# Altium PCB PCB1.PcbDoc (part 2 of 2)
Units mm, origin at the board's own origin, x right, y up, seen from the top; angles counter-clockwise.
Board outline 42.2 x 61.7 mm, 4 copper layers (Top Layer, Mid Layer 1, Mid Layer 2, Bottom Layer), stack 1.586 mm thick; 117 components, 70 nets, 392 pads, 1231 vias.
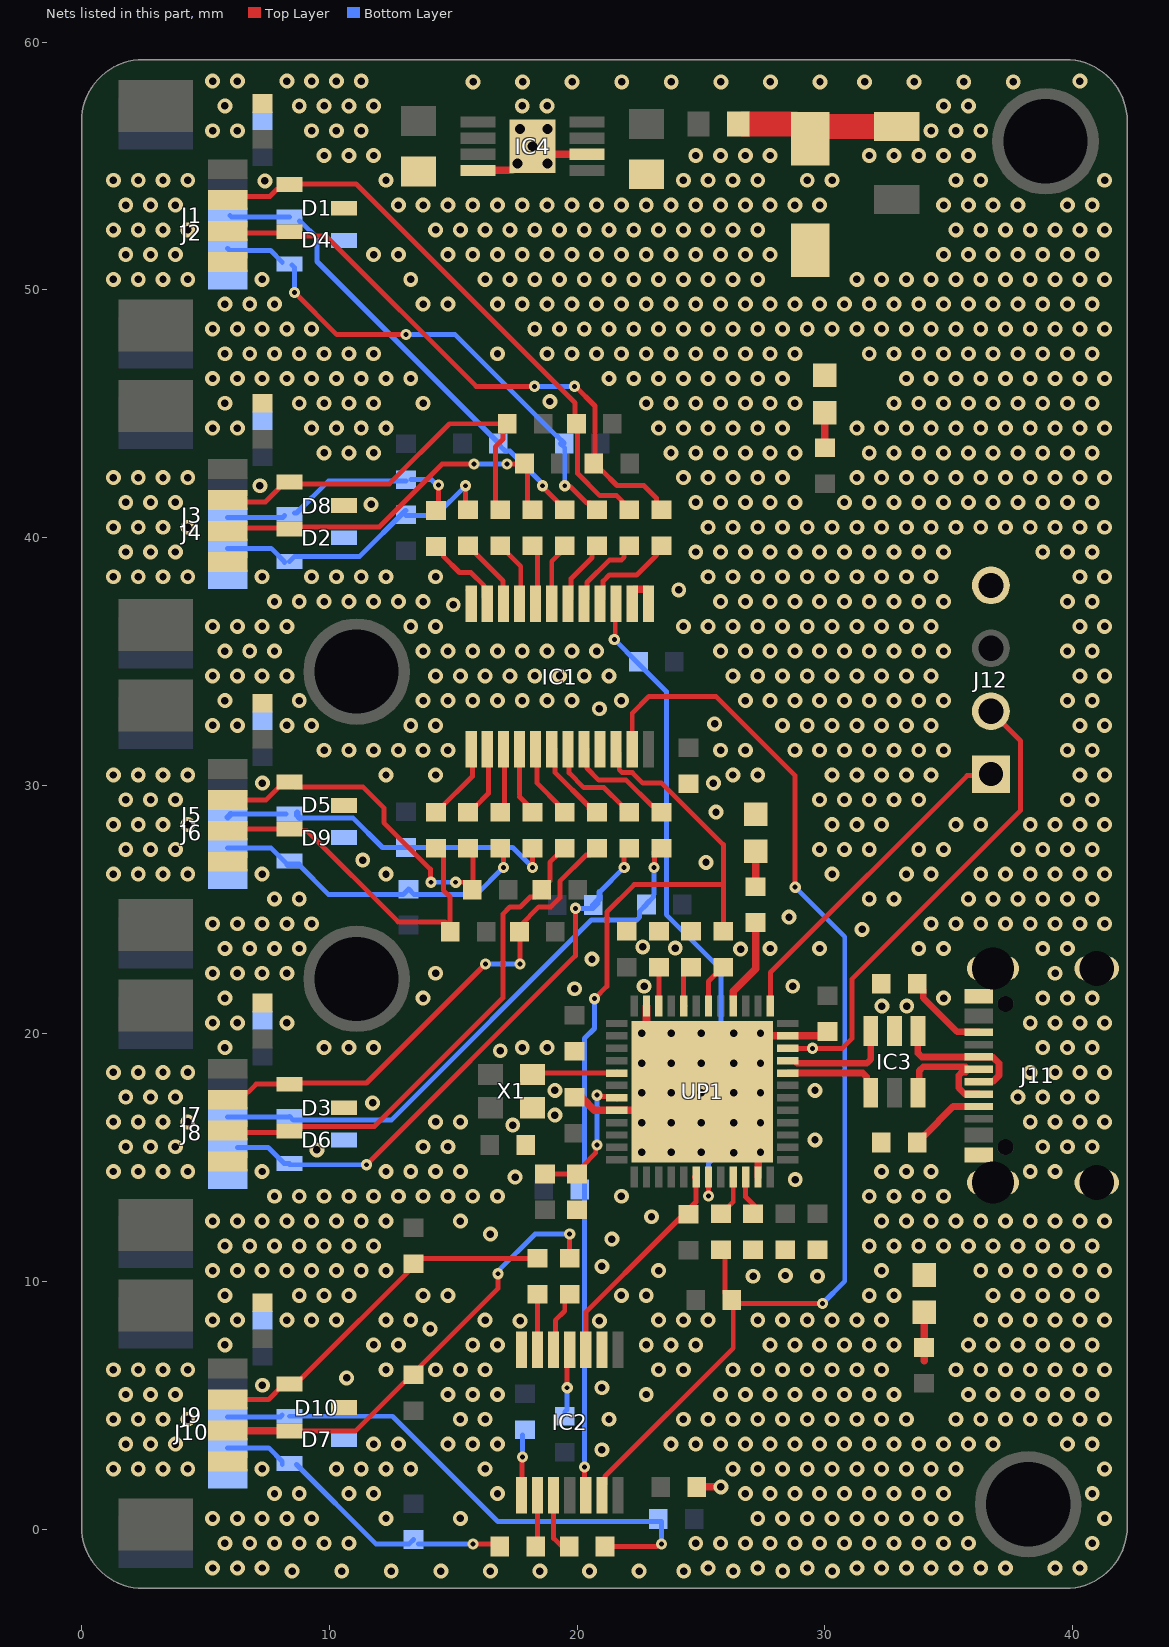
[diagram p4: the nets of this part, all layers, seen from the top]

## Via types
v1: diameter 0.6, hole 0.3, Top Layer to Bottom Layer, tented both sides, 1189 vias
v2: diameter 0.45, hole 0.2, Top Layer to Bottom Layer, tented both sides, 35 vias
v3: diameter 0.6, hole 0.4, Top Layer to Bottom Layer, tented both sides, 7 vias

## Nets (pads, with @x,y where several pads share a name; then routed paths per layer and width w, separated by ;. In a path a pad name is that pad's centre, name@x,y a point inside that pad or via, vN(x,y) a via of type N, cw(c..) or ccw(c..) an arc to the next point about the centre after c; other vN are vias at no path point) (continued)
GND: C1.2 C2.2 C3.2 C4.2 C5.2 C6.2 C7.2 C8.2 C9.2 C10.2 C11.2 C12.2 C13.2 C14.2 C15.2 C16.2 C17.2 C18.2 C19.2 C20.2 C21.2 C22.2 C23.2 C24.2 D1.3 D2.3 D3.3 D4.3 D5.3 D6.3 D7.3 D8.3 D9.3 D10.3 D11.2 IC1.1 IC1.2 IC1.12 IC1.21 IC2.2 IC2.7 IC3.2 IC4.4 IC4.6 IC4.9 J1.4 J2.1 J3.4 J4.1 J5.4 J6.1 J7.4 J8.1 J9.4 J10.1 J11.1 J11.2 J11.3 J11.4 J11.A1-B12 J11.B1-A12 J12.4 OL1.1 OL2.1 OL3.1 R5.1 R54.2 R55.2 UP1.8 UP1.23 UP1.35 UP1.47 UP1.49 X1.2 | length 15.4
  Top Layer w0.2: D8.3@10.65,41.225 D8.3@10.875,41.225
  Top Layer w0.305: J3.4@5.253,38.777 5.5,39.025 J3.4@5.9,39.025 ; IC1.12@15.653,37.9 15.725,37.828 IC1.12@15.725,37.338 ; IC4.4@16,54.825 17.377,54.825 17.7,55.148 IC4.9@17.7,55.4 ; IC2.7@17.678,7.8 17.75,7.728 IC2.7@17.75,7.238 ; X1.2@17.925,16.9 X1.2@18.05,17.025 ; IC4.9@18.9,55.5 18.925,55.475 IC4.6@20.4,55.475 ; C6.2@20.2,17.4 20.7,16.9 UP1.8@21.6,16.9 UP1.49@22.4,16.9 ; IC1.21@20.913,31.474 IC1.21@20.925,31.462 ; IC1.2@22.225,37.338 22.225,37.851 22.297,37.923 22.875,37.923 IC1.1@22.898,37.9 ; UP1.49@22.8,20.1 UP1.47@22.8,21.1 ; C11.2@24.522,30.083 C11.2@24.526,30.088 ; C12.2@24.825,1.7 v1(25.8,1.7) ; v1@25.488,30.088 v1(25.5,30.1) ; UP1.23@27.3,14.2 27.3,15.1 v1(27.4,15.2) ; UP1.49@27.5,19.9 UP1.35@28.5,19.9 28.503,19.903 30.003,19.903 C2.2@30.2,20.1
  other v1: 8.5,-1.7 10.5,-1.7 12.5,-1.7 14.5,-1.7 16.5,-1.7 18.5,-1.7 20.5,-1.7 22.5,-1.7 24.3,-1.7 26.3,-1.7 28.3,-1.7 30.3,-1.7 5.287,-1.573 6.287,-1.573 7.287,-1.573 25.287,-1.573 27.287,-1.573 29.287,-1.573 31.287,-1.573 32.287,-1.573 33.287,-1.573 34.287,-1.573 35.287,-1.573 36.287,-1.573 37.287,-1.573 39.287,-1.573 40.287,-1.573 5.787,-0.573 6.787,-0.573 7.787,-0.573 8.787,-0.573 9.787,-0.573 10.787,-0.573 24.787,-0.573 25.787,-0.573 26.787,-0.573 27.787,-0.573 28.787,-0.573 29.787,-0.573 30.787,-0.573 31.787,-0.573 32.787,-0.573 33.787,-0.573 34.787,-0.573 35.787,-0.573 40.787,-0.573 5.287,0.427 6.287,0.427 7.287,0.427 8.287,0.427 9.287,0.427 12.287,0.427 15.287,0.427 27.287,0.427 28.287,0.427 29.287,0.427 30.287,0.427 31.287,0.427 32.287,0.427 33.287,0.427 34.287,0.427 35.287,0.427 41.287,0.427 7.787,1.427 8.787,1.427 10.787,1.427 11.787,1.427 16.787,1.427 26.787,1.427 27.787,1.427 28.787,1.427 29.787,1.427 30.787,1.427 31.787,1.427 32.787,1.427 33.787,1.427 34.787,1.427 40.787,1.427 1.287,2.427 2.287,2.427 3.287,2.427 4.287,2.427 7.287,2.427 10.287,2.427 11.287,2.427 12.287,2.427 13.287,2.427 16.287,2.427 26.287,2.427 27.287,2.427 28.287,2.427 29.287,2.427 30.287,2.427 31.287,2.427 32.287,2.427 33.287,2.427 34.287,2.427 35.287,2.427 41.287,2.427 21,3.2 1.787,3.427 2.787,3.427 3.787,3.427 11.787,3.427 12.787,3.427 14.787,3.427 15.787,3.427 16.787,3.427 23.787,3.427 24.787,3.427 25.787,3.427 26.787,3.427 27.787,3.427 28.787,3.427 29.787,3.427 30.787,3.427 31.787,3.427 32.787,3.427 33.787,3.427 34.787,3.427 35.787,3.427 36.787,3.427 39.787,3.427 40.787,3.427 1.287,4.427 2.287,4.427 3.287,4.427 4.287,4.427 15.287,4.427 16.287,4.427 21.287,4.427 24.287,4.427 25.287,4.427 26.287,4.427 27.287,4.427 28.287,4.427 29.287,4.427 30.287,4.427 31.287,4.427 32.287,4.427 33.287,4.427 35.287,4.427 36.287,4.427 37.287,4.427 38.287,4.427 39.287,4.427 40.287,4.427 41.287,4.427 1.787,5.427 2.787,5.427 3.787,5.427 14.787,5.427 15.787,5.427 16.787,5.427 22.787,5.427 25.787,5.427 26.787,5.427 27.787,5.427 28.787,5.427 29.787,5.427 30.787,5.427 31.787,5.427 32.787,5.427 35.787,5.427 36.787,5.427 37.787,5.427 38.787,5.427 39.787,5.427 40.787,5.427 21,5.7 7.3,5.8 10.7,6.1 1.287,6.427 2.287,6.427 3.287,6.427 4.287,6.427 12.287,6.427 14.287,6.427 15.287,6.427 16.287,6.427 23.287,6.427 24.287,6.427 26.287,6.427 27.287,6.427 28.287,6.427 29.287,6.427 30.287,6.427 31.287,6.427 32.287,6.427 35.287,6.427 36.287,6.427 37.287,6.427 38.287,6.427 39.287,6.427 40.287,6.427 41.287,6.427 5.787,7.427 11.787,7.427 12.787,7.427 15.787,7.427 16.787,7.427 22.787,7.427 23.787,7.427 24.787,7.427 27.787,7.427 28.787,7.427 29.787,7.427 30.787,7.427 31.787,7.427 32.787,7.427 35.787,7.427 36.787,7.427 37.787,7.427 38.787,7.427 39.787,7.427 40.787,7.427 14.066,8.075 17.7,8.4 20.9,8.4 5.287,8.427 6.287,8.427 8.287,8.427 9.287,8.427 10.287,8.427 12.287,8.427 13.287,8.427 16.287,8.427 23.287,8.427 24.287,8.427 25.287,8.427 27.287,8.427 28.287,8.427 29.287,8.427 30.287,8.427 31.287,8.427 32.287,8.427 36.287,8.427 37.287,8.427 38.287,8.427 39.287,8.427 40.287,8.427 41.287,8.427 5.787,9.427 8.787,9.427 9.787,9.427 10.787,9.427 13.787,9.427 14.787,9.427 21.787,9.427 22.787,9.427 31.787,9.427 32.787,9.427 36.787,9.427 37.787,9.427 38.787,9.427 39.787,9.427 40.787,9.427 27.1,10.2 29.7,10.2 28.403,10.231 5.287,10.427 6.287,10.427 7.287,10.427 8.287,10.427 9.287,10.427 10.287,10.427 11.287,10.427 12.287,10.427 23.287,10.427 32.287,10.427 36.287,10.427 37.287,10.427 38.287,10.427 39.287,10.427 40.287,10.427 41.287,10.427 21,10.6 5.787,11.427 6.787,11.427 7.787,11.427 8.787,11.427 9.787,11.427 10.787,11.427 11.787,11.427 31.787,11.427 32.787,11.427 33.787,11.427 34.787,11.427 35.787,11.427 36.787,11.427 37.787,11.427 38.787,11.427 39.787,11.427 40.787,11.427 21.4,11.7 16.5,11.9 5.287,12.427 6.287,12.427 7.287,12.427 8.287,12.427 9.287,12.427 10.287,12.427 11.287,12.427 12.287,12.427 15.287,12.427 32.287,12.427 33.287,12.427 34.287,12.427 35.287,12.427 36.287,12.427 37.287,12.427 38.287,12.427 39.287,12.427 40.287,12.427 41.287,12.427 23,12.6 7.787,13.427 8.787,13.427 9.787,13.427 10.787,13.427 11.787,13.427 12.787,13.427 13.787,13.427 14.787,13.427 15.787,13.427 16.787,13.427 21.787,13.427 31.787,13.427 32.787,13.427 33.787,13.427 34.787,13.427 28.8,14.1 17.5,14.2 1.287,14.427 2.287,14.427 3.287,14.427 4.287,14.427 7.287,14.427 12.287,14.427 13.287,14.427 14.287,14.427 15.287,14.427 32.287,14.427 33.287,14.427 34.287,14.427 38.287,14.427 39.287,14.427 26.322,15.183 22.6,15.2 23.8,15.2 25,15.2 9.5,15.3 1.787,15.427 2.787,15.427 3.787,15.427 13.787,15.427 14.787,15.427 38.787,15.427 39.787,15.427 40.787,15.427 29.6,15.7 17.4,16.3 22.6,16.4 23.8,16.4 25,16.4 26.327,16.4 27.4,16.4 1.287,16.427 2.287,16.427 3.287,16.427 4.287,16.427 14.287,16.427 15.287,16.427 38.287,16.427 39.287,16.427 40.287,16.427 41.287,16.427 19.1,16.7 11.749,17.193 1.787,17.427 2.787,17.427 3.787,17.427 37.787,17.427 38.787,17.427 39.787,17.427 40.787,17.427 22.6,17.6 23.8,17.6 25,17.6 26.327,17.6 27.4,17.6 19.1,17.7 29.6,17.7 1.287,18.427 2.287,18.427 3.287,18.427 4.287,18.427 38.287,18.427 39.287,18.427 40.287,18.427 41.287,18.427 22.6,18.8 23.8,18.8 25,18.8 26.327,18.8 27.4,18.8 16.9,19.3 5.787,19.427 9.787,19.427 10.787,19.427 11.787,19.427 17.787,19.427 18.787,19.427 38.787,19.427 39.787,19.427 40.787,19.427 22.6,20 23.8,20 25,20 26.327,20 27.4,20 5.287,20.427 6.287,20.427 8.287,20.427 38.287,20.427 39.287,20.427 40.287,20.427 41.287,20.427 32.3,21.1 33.3,21.1 5.787,21.427 13.787,21.427 34.787,21.427 38.787,21.427 39.787,21.427 40.787,21.427 19.9,21.8 22.7,21.9 28.7,21.9 5.287,22.427 6.287,22.427 7.287,22.427 8.287,22.427 14.287,22.427 39.287,22.427 20.6,23 26.6,23.4 5.787,23.427 6.787,23.427 7.787,23.427 8.787,23.427 23.959,23.441 27.787,23.427 29.787,23.427 33.787,23.427 34.787,23.427 38.787,23.427 39.787,23.427 22.649,23.493 31.5,24.2 5.287,24.427 6.287,24.427 7.287,24.427 8.287,24.427 9.287,24.427 34.287,24.427 35.287,24.427 36.287,24.427 37.287,24.427 38.287,24.427 39.287,24.427 40.287,24.427 41.287,24.427 28.549,24.693 7.787,25.427 8.787,25.427 31.787,25.427 32.787,25.427 35.787,25.427 36.787,25.427 37.787,25.427 38.787,25.427 39.787,25.427 40.787,25.427 1.287,26.427 2.287,26.427 3.287,26.427 4.287,26.427 7.287,26.427 12.287,26.427 30.287,26.427 33.287,26.427 34.287,26.427 36.287,26.427 37.287,26.427 38.287,26.427 39.287,26.427 40.287,26.427 41.287,26.427 25.2,26.9 11.349,26.993 1.787,27.427 2.787,27.427 3.787,27.427 29.787,27.427 30.787,27.427 31.787,27.427 33.787,27.427 34.787,27.427 37.787,27.427 38.787,27.427 39.787,27.427 40.787,27.427 1.287,28.427 2.287,28.427 3.287,28.427 4.287,28.427 30.287,28.427 31.287,28.427 32.287,28.427 35.287,28.427 36.287,28.427 38.287,28.427 39.287,28.427 40.287,28.427 41.287,28.427 25.603,28.931 1.787,29.427 2.787,29.427 3.787,29.427 29.787,29.427 30.787,29.427 31.787,29.427 32.787,29.427 33.787,29.427 39.787,29.427 40.787,29.427 7.3,30.1 1.287,30.427 2.287,30.427 3.287,30.427 4.287,30.427 12.287,30.427 14.287,30.427 26.287,30.427 27.287,30.427 30.287,30.427 31.287,30.427 32.287,30.427 33.287,30.427 34.287,30.427 40.287,30.427 41.287,30.427 9.787,31.427 10.787,31.427 11.787,31.427 12.787,31.427 13.787,31.427 14.787,31.427 25.787,31.427 26.787,31.427 28.787,31.427 29.787,31.427 30.787,31.427 31.787,31.427 32.787,31.427 33.787,31.427 34.787,31.427 39.787,31.427 40.787,31.427 5.287,32.427 6.287,32.427 8.287,32.427 9.287,32.427 13.287,32.427 14.287,32.427 28.287,32.427 29.287,32.427 30.287,32.427 31.287,32.427 32.287,32.427 33.287,32.427 34.287,32.427 40.287,32.427 41.287,32.427 25.549,32.493 20.9,33.1 5.787,33.427 8.787,33.427 13.787,33.427 14.787,33.427 15.787,33.427 16.787,33.427 17.787,33.427 18.787,33.427 19.787,33.427 21.787,33.427 26.787,33.427 27.787,33.427 28.787,33.427 29.787,33.427 30.787,33.427 31.787,33.427 32.787,33.427 33.787,33.427 34.787,33.427 39.787,33.427 40.787,33.427 5.287,34.427 6.287,34.427 7.287,34.427 8.287,34.427 14.287,34.427 15.287,34.427 16.287,34.427 17.287,34.427 18.287,34.427 19.287,34.427 20.287,34.427 21.287,34.427 26.287,34.427 27.287,34.427 28.287,34.427 29.287,34.427 30.287,34.427 31.287,34.427 32.287,34.427 33.287,34.427 34.287,34.427 40.287,34.427 41.287,34.427 5.787,35.427 6.787,35.427 7.787,35.427 13.787,35.427 14.787,35.427 15.787,35.427 16.787,35.427 17.787,35.427 18.787,35.427 19.787,35.427 20.787,35.427 25.787,35.427 26.787,35.427 27.787,35.427 28.787,35.427 29.787,35.427 30.787,35.427 31.787,35.427 32.787,35.427 33.787,35.427 34.787,35.427 39.787,35.427 40.787,35.427 5.287,36.427 6.287,36.427 7.287,36.427 8.287,36.427 13.287,36.427 14.287,36.427 24.287,36.427 25.287,36.427 26.287,36.427 27.287,36.427 28.287,36.427 29.287,36.427 30.287,36.427 31.287,36.427 32.287,36.427 33.287,36.427 34.287,36.427 40.287,36.427 41.287,36.427 15,37.3 7.787,37.427 8.787,37.427 9.787,37.427 10.787,37.427 11.787,37.427 12.787,37.427 13.787,37.427 25.787,37.427 26.787,37.427 27.787,37.427 28.787,37.427 29.787,37.427 30.787,37.427 31.787,37.427 32.787,37.427 33.787,37.427 34.787,37.427 39.787,37.427 40.787,37.427 24.1,37.9 1.287,38.427 2.287,38.427 3.287,38.427 4.287,38.427 7.287,38.427 9.287,38.427 10.287,38.427 11.287,38.427 12.287,38.427 14.287,38.427 25.287,38.427 26.287,38.427 27.287,38.427 28.287,38.427 29.287,38.427 30.287,38.427 31.287,38.427 32.287,38.427 33.287,38.427 34.287,38.427 40.287,38.427 41.287,38.427 1.787,39.427 2.787,39.427 3.787,39.427 24.787,39.427 25.787,39.427 26.787,39.427 27.787,39.427 28.787,39.427 29.787,39.427 30.787,39.427 31.787,39.427 32.787,39.427 33.787,39.427 34.787,39.427 38.787,39.427 39.787,39.427 40.787,39.427 1.287,40.427 2.287,40.427 3.287,40.427 4.287,40.427 25.287,40.427 26.287,40.427 27.287,40.427 28.287,40.427 29.287,40.427 30.287,40.427 31.287,40.427 32.287,40.427 33.287,40.427 34.287,40.427 35.287,40.427 36.287,40.427 37.287,40.427 38.287,40.427 39.287,40.427 40.287,40.427 41.287,40.427 11.685,41.347 1.787,41.427 2.787,41.427 3.787,41.427 24.787,41.427 25.787,41.427 26.787,41.427 27.787,41.427 28.787,41.427 30.787,41.427 31.787,41.427 32.787,41.427 33.787,41.427 34.787,41.427 35.787,41.427 36.787,41.427 37.787,41.427 38.787,41.427 39.787,41.427 40.787,41.427 7.2,42.1 1.287,42.427 2.287,42.427 3.287,42.427 4.287,42.427 24.287,42.427 25.287,42.427 26.287,42.427 27.287,42.427 28.287,42.427 31.287,42.427 32.287,42.427 33.287,42.427 34.287,42.427 35.287,42.427 36.287,42.427 37.287,42.427 38.287,42.427 39.287,42.427 40.287,42.427 41.287,42.427 9.787,43.427 10.787,43.427 11.787,43.427 23.787,43.427 24.787,43.427 25.787,43.427 26.787,43.427 27.787,43.427 28.787,43.427 31.787,43.427 32.787,43.427 33.787,43.427 34.787,43.427 35.787,43.427 36.787,43.427 37.787,43.427 38.787,43.427 39.787,43.427 40.787,43.427 5.287,44.427 6.287,44.427 9.287,44.427 10.287,44.427 11.287,44.427 12.287,44.427 23.287,44.427 24.287,44.427 25.287,44.427 26.287,44.427 27.287,44.427 28.287,44.427 31.287,44.427 32.287,44.427 33.287,44.427 34.287,44.427 35.287,44.427 36.287,44.427 37.287,44.427 38.287,44.427 39.287,44.427 40.287,44.427 41.287,44.427 5.787,45.427 8.787,45.427 9.787,45.427 10.787,45.427 11.787,45.427 13.787,45.427 22.787,45.427 23.787,45.427 24.787,45.427 25.787,45.427 26.787,45.427 27.787,45.427 28.787,45.427 32.787,45.427 33.787,45.427 34.787,45.427 35.787,45.427 36.787,45.427 37.787,45.427 38.787,45.427 39.787,45.427 40.787,45.427 18.9,45.5 5.287,46.427 6.287,46.427 7.287,46.427 8.287,46.427 9.287,46.427 10.287,46.427 11.287,46.427 12.287,46.427 13.287,46.427 21.287,46.427 22.287,46.427 23.287,46.427 24.287,46.427 25.287,46.427 26.287,46.427 27.287,46.427 28.287,46.427 33.287,46.427 34.287,46.427 35.287,46.427 36.287,46.427 37.287,46.427 38.287,46.427 39.287,46.427 40.287,46.427 41.287,46.427 5.787,47.427 6.787,47.427 7.787,47.427 8.787,47.427 9.787,47.427 10.787,47.427 11.787,47.427 16.787,47.427 18.787,47.427 19.787,47.427 20.787,47.427 21.787,47.427 22.787,47.427 23.787,47.427 24.787,47.427 25.787,47.427 26.787,47.427 27.787,47.427 28.787,47.427 31.787,47.427 32.787,47.427 33.787,47.427 34.787,47.427 35.787,47.427 36.787,47.427 37.787,47.427 38.787,47.427 39.787,47.427 40.787,47.427 5.287,48.427 6.287,48.427 7.287,48.427 8.287,48.427 9.287,48.427 18.287,48.427 19.287,48.427 20.287,48.427 21.287,48.427 22.287,48.427 23.287,48.427 24.287,48.427 25.287,48.427 26.287,48.427 27.287,48.427 28.287,48.427 29.287,48.427 30.287,48.427 31.287,48.427 32.287,48.427 33.287,48.427 34.287,48.427 35.287,48.427 36.287,48.427 37.287,48.427 38.287,48.427 39.287,48.427 40.287,48.427 41.287,48.427 5.787,49.427 6.787,49.427 7.787,49.427 13.787,49.427 14.787,49.427 16.787,49.427 17.787,49.427 18.787,49.427 19.787,49.427 20.787,49.427 21.787,49.427 22.787,49.427 23.787,49.427 24.787,49.427 25.787,49.427 26.787,49.427 27.787,49.427 28.787,49.427 29.787,49.427 30.787,49.427 31.787,49.427 32.787,49.427 33.787,49.427 34.787,49.427 35.787,49.427 36.787,49.427 37.787,49.427 38.787,49.427 39.787,49.427 40.787,49.427 1.287,50.427 2.287,50.427 3.287,50.427 4.287,50.427 7.287,50.427 13.287,50.427 16.287,50.427 17.287,50.427 18.287,50.427 19.287,50.427 20.287,50.427 21.287,50.427 22.287,50.427 23.287,50.427 24.287,50.427 25.287,50.427 26.287,50.427 27.287,50.427 31.287,50.427 32.287,50.427 33.287,50.427 34.287,50.427 35.287,50.427 36.287,50.427 37.287,50.427 38.287,50.427 39.287,50.427 40.287,50.427 41.287,50.427 1.787,51.427 2.787,51.427 3.787,51.427 11.787,51.427 12.787,51.427 14.787,51.427 15.787,51.427 16.787,51.427 17.787,51.427 18.787,51.427 19.787,51.427 20.787,51.427 21.787,51.427 22.787,51.427 23.787,51.427 24.787,51.427 25.787,51.427 26.787,51.427 27.787,51.427 34.787,51.427 35.787,51.427 36.787,51.427 37.787,51.427 38.787,51.427 39.787,51.427 40.787,51.427 1.287,52.427 2.287,52.427 3.287,52.427 4.287,52.427 14.287,52.427 15.287,52.427 16.287,52.427 17.287,52.427 18.287,52.427 19.287,52.427 20.287,52.427 21.287,52.427 22.287,52.427 23.287,52.427 24.287,52.427 25.287,52.427 26.287,52.427 27.287,52.427 35.287,52.427 36.287,52.427 37.287,52.427 38.287,52.427 39.287,52.427 40.287,52.427 41.287,52.427 1.787,53.427 2.787,53.427 3.787,53.427 12.787,53.427 13.787,53.427 14.787,53.427 15.787,53.427 16.787,53.427 17.787,53.427 18.787,53.427 19.787,53.427 20.787,53.427 21.787,53.427 22.787,53.427 23.787,53.427 24.787,53.427 25.787,53.427 26.787,53.427 27.787,53.427 28.787,53.427 29.787,53.427 34.787,53.427 35.787,53.427 36.787,53.427 37.787,53.427 39.787,53.427 40.787,53.427 7.4,54.4 1.287,54.427 2.287,54.427 3.287,54.427 4.287,54.427 12.287,54.427 24.287,54.427 25.287,54.427 26.287,54.427 27.287,54.427 29.287,54.427 30.287,54.427 35.287,54.427 36.287,54.427 41.287,54.427 9.787,55.427 10.787,55.427 11.787,55.427 24.787,55.427 25.787,55.427 26.787,55.427 27.787,55.427 31.787,55.427 32.787,55.427 33.787,55.427 34.787,55.427 35.787,55.427 5.287,56.427 6.287,56.427 9.287,56.427 10.287,56.427 11.287,56.427 34.287,56.427 35.287,56.427 36.287,56.427 5.787,57.427 8.787,57.427 9.787,57.427 10.787,57.427 11.787,57.427 17.787,57.427 18.787,57.427 34.787,57.427 35.787,57.427 15.8,58.4 17.8,58.4 19.8,58.4 21.8,58.4 23.8,58.4 25.8,58.4 27.8,58.4 29.8,58.4 31.6,58.4 33.6,58.4 35.6,58.4 37.6,58.4 5.287,58.427 6.287,58.427 8.287,58.427 9.287,58.427 10.287,58.427 11.287,58.427 40.287,58.427
  other v3: 17.6,55.1 18.8,55.1 18.2,55.8 17.7,56.5 18.8,56.5
I2C_RESET1: IC1.3 R26.2 UP1.19 | length 26.5
  Top Layer w0.2: v2(21.5,35.9) 21.538,35.937 21.538,36.938 IC1.3@21.6,37 ; v2(25.3,13.437) UP1.19@25.3,14.3
  Bottom Layer w0.2: v2(21.5,35.9) 22.45,34.95 23.6,33.8 23.6,24.79 25.8,22.59 25.8,15.255 25.3,14.755 v2(25.3,13.437)
I2C_RESET2: IC2.3 R31.2 UP1.18 | length 8.8
  Top Layer w0.2: IC2.3@20.35,7.238 20.35,8.75 23.463,11.863 24.35,12.75 24.797,13.197 UP1.18@24.797,14.197
  Top Layer w0.305: UP1.18@24.797,14.197 UP1.18@24.8,14.2
I2C_SCL: IC1.22 IC2.12 R3.1 R27.2 | length 37.9
  Top Layer w0.2: IC2.12@20.3,2 v2(20.3,2.5) ; v2(20.7,21.4) 21.2,21.9 21.2,24.9 22.3,26 25.9,26 ; IC1.22@21.575,31.462 21.7,31.337 21.7,30.64 21.817,30.523 22.229,30.523 22.652,30.1 23.414,30.1 25.9,27.614 25.9,26 ; R3.1@25.9,24.369 25.9,26
  Bottom Layer w0.2: v2@20.3,2.646 20.3,13.7 20.3,18.4 20.3,19.8 20.7,20.2 v2(20.7,21.4)
I2C_SDA: IC1.23 IC2.13 R2.1 R28.2 | length 47.6
  Top Layer w0.2: IC2.13@21,1.7 21.125,1.825 21.125,2.125 26.3,7.3 26.3,9.1 v2(29.9,9.1) ; IC1.23@22.225,31.462 22.225,32.925 22.9,33.6 25.6,33.6 28.8,30.4 v2(28.8,25.9) ; R2.1@25.8,11.275 25.96,11.115 25.96,9.516 R28.2@26.235,9.241
  Bottom Layer w0.2: v2(28.8,25.9) 30.8,23.9 30.8,10 v2(29.9,9.1)
INT0: IC2.4 R29.2 | length 2.5
  Top Layer w0.2: v2@19.6,5.8 19.6,7.138 IC2.4@19.7,7.238
  Bottom Layer w0.2: R29.2@19.5,4.725 19.6,4.825 v2(19.6,5.7)
INT1: IC2.8 R30.2 | length 2.6
  Top Layer w0.2: IC2.8@17.75,1.362 17.775,1.387 17.775,2.975 v2@17.8,3
  Bottom Layer w0.2: v2(17.8,2.9) R30.2@17.8,3.8
MCU_BOOT0: R5.2 UP1.44 | length 1.3
  Top Layer w0.2: UP1.44@24.3,21.1 R5.2@24.3,22.3
  Top Layer w0.305: R5.2@24.6,22.65 R5.2@24.7,22.55
MCU_I2C_SCL: R3.2 UP1.42 | length 1.8
  Top Layer w0.2: UP1.42@25.3,21.1 25.3,22.1 25.8,22.6 R3.2@25.8,22.7
MCU_I2C_SDA: R2.2 UP1.21 | length 1.6
  Top Layer w0.2: R2.2@25.9,12.8 26.3,13.2 UP1.21@26.3,14.2
MCU_LED: R1.2 UP1.40 | length 3.5
  Top Layer w0.305: UP1.40@26.303,21.372 26.303,21.702 27.2,22.6 R1.2@27.2,24.455
MCU_NRST: C10.1 R4.1 UP1.7 | length 5.6
  Top Layer w0.2: R4.1@18.8,14.325 C10.1@20,14.325 ; C10.1@19.9,14.325 19.925,14.325 20.2,14.6 20.2,14.625 20.752,15.177 20.752,15.452 v2(20.8,15.5) ; v2(20.807,17.507) 20.874,17.507 20.931,17.45 21.55,17.45 UP1.7@21.597,17.403
  Top Layer w0.305: UP1.7@21.597,17.403 UP1.7@21.6,17.4
  Bottom Layer w0.2: v2(20.8,15.5) 20.803,15.503 20.803,17.503 v2(20.807,17.507)
MCU_USB_N: IC3.4 UP1.32 | length 4
  Top Layer w0.269: UP1.32@28.5,18.4 31.527,18.4 31.685,18.242 31.685,17.765 IC3.4@31.85,17.6
MCU_USB_P: IC3.3 UP1.33 | length 4.6
  Top Layer w0.269: UP1.33@28.5,18.9 28.775,18.9 28.879,18.796 31.692,18.796 31.85,18.954 IC3.3@31.85,20.1
MCU_VCAP1: C8.1 UP1.22 | length 1.5
  Top Layer w0.2: UP1.22@26.8,14.2 26.8,13.4 C8.1@27.3,12.9
MCU_VCAP2: C9.1 UP1.46 | length 1.3
  Top Layer w0.2: UP1.46@23.3,21.1 C9.1@23.3,22.4
MCU_XTAL_IN: UP1.5 X1.3 | length 3.8
  Top Layer w0.2: X1.3@17.8,18.4 18.7,18.4 18.703,18.397 UP1.5@21.597,18.397
  Top Layer w0.305: UP1.5@21.597,18.397 UP1.5@21.6,18.4
NetD11_1: D11.1 F1.2 FB1.1 | length 7
  Top Layer w1: FB1.1@26.7,56.7 28.8,56.7 28.825,56.675 29.125,56.675 29.4,56.4 D11.1@29.4,56.1 29.4,56.325 29.675,56.6 F1.2@32.9,56.6
NetOL1_2: OL1.2 R1.1 | length 1.5
  Top Layer w0.305: OL1.2@27.2,27.375 27.2,26.025 R1.1@27.3,25.925
NetOL2_2: OL2.2 R52.1 | length 2.1
  Top Layer w0.2: R52.1@34,7.6 34.1,7.5 R52.1@34.2,7.5
  Top Layer w0.305: 34,6.8 R52.1@34,7.5 ; R52.1@34,7.6 OL2.2@34,8.75
NetOL3_2: OL3.2 R53.1 | length 1.6
  Top Layer w0.305: R53.1@30,43.425 OL3.2@30,45.05
SC0: D1.1 J1.2 R6.2 R37.2 | length 23.3
  Top Layer w0.2: J1.2@5.875,53.55 6.1,53.775 7.6,53.775 7.9,54.075 8.187,54.075 D1.1@8.387,54.275 ; D1.1@8.462,54.325 D1.1@8.687,54.325 ; D1.1@8.687,54.275 11.085,54.275 19.914,45.446 19.914,44.703 20.015,44.602 20.015,42.6 20.913,41.702 21.598,41.702 21.9,41.4 R37.2@22,41.3
SC1: D4.2 J2.3 R16.2 R47.2 | length 18.5
  Top Layer w0.2: v2(18.6,42.1) 18.6,42.063 19.2,41.463 19.2,41.4 19.454,41.146 R47.2@19.517,41.146
  Bottom Layer w0.2: J2.3@6,53 6.05,52.95 D4.2@8.4,52.95 ; D4.2@8.8,52.775 8.825,52.75 8.85,52.75 9.5,52.1 9.5,51.15 16.825,43.825 R16.2@16.825,43.8 ; R16.2@16.9,43.7 17.1,43.5 17.285,43.5 18.552,42.233 18.552,42.148 v2(18.6,42.1)
SC2: D8.1 J3.2 R7.2 R38.2 | length 16
  Top Layer w0.2: J3.2@5.875,41.45 7.425,41.45 8.15,42.175 D8.1@8.375,42.175 ; D8.1@8.45,42.175 12.425,42.175 14.852,44.602 R7.2@16.903,44.602 ; R38.2@16.972,41.158 16.972,41.228 16.7,41.5 16.7,43.668 17.01,43.978 17.01,44.416 R7.2@17.194,44.6
SC3: D2.2 J4.3 R17.2 R48.2 | length 9.5
  Top Layer w0.2: R48.2@14.39,41.121 14.4,41.131 v2@14.4,42.075
  Bottom Layer w0.2: J4.3@5.9,40.825 8.125,40.825 D2.2@8.2,40.9 ; D2.2@8.6,41 8.675,41 9.975,42.3 R17.2@13.1,42.3 ; R17.2@13.3,42.35 14.107,42.35 14.332,42.125 v2(14.4,42.125)
SC4: D5.1 J5.2 R8.2 R39.2 | length 14.4
  Top Layer w0.2: J5.2@5.9,29.425 7.45,29.425 8.2,30.175 D5.1@8.2,30.2 ; D5.1@8.4,30.15 8.6,29.95 11.35,29.95 12.2,29.1 12.2,28.5 14.075,26.625 14.075,26.125 v2(14.1,26.1) ; v2(15.1,26.1) 15.5,26.1 15.559,26.041 R8.2@15.559,25.875 ; R39.2@15.596,27.535 R39.2@15.596,27.635 ; R8.2@15.796,25.875 R39.2@15.796,27.535
  Top Layer w0.254: R8.2@15.559,25.875 R8.2@15.796,25.875 ; R39.2@15.696,27.535 R39.2@15.761,27.6
  Bottom Layer w0.2: v2(14.1,26.1) v2(15.1,26.1)
SC5: D9.2 J6.3 R18.2 R49.2 | length 13.7
  Top Layer w0.2: v2(18.2,26.7) R49.2@18.2,27.518
  Bottom Layer w0.2: J6.3@6.025,28.85 D9.2@8.25,28.85 ; D9.2@8.798,28.7 10.948,28.7 12.148,27.5 R18.2@13.1,27.5 17.4,27.5 v2(18.2,26.7)
  Bottom Layer w0.254: J6.3@5.9,28.725 J6.3@6.025,28.85 ; D9.2@8.7,28.9 8.7,28.798 D9.2@8.798,28.7
SC6: D3.1 J7.2 R9.2 R40.2 | length 20.1
  Top Layer w0.2: J7.2@5.9,17.325 6.2,17.625 6.725,17.625 7.05,17.95 D3.1@8.4,17.95 ; D3.1@8.4,18 11.5,18 v2(16.3,22.8) ; R9.2@17.675,24.1 17.7,24.075 v2(17.7,22.8) ; R9.2@17.7,24.35 18.457,25.107 18.942,25.107 19.3,25.465 19.3,26.135 20.365,27.2 20.525,27.2 R40.2@20.8,27.475
  Bottom Layer w0.2: v2(16.3,22.8) v2(17.7,22.8)
SC7: D6.2 J8.3 R19.2 R50.2 | length 23.5
  Top Layer w0.2: v2@23.127,26.727 R50.2@23.127,27.227
  Top Layer w0.254: v2(23.1,26.7) v2@23.127,26.727 ; R50.2@23.127,27.327 23.127,27.227 23.495,27.595 R50.2@23.5,27.595
  Bottom Layer w0.2: J8.3@5.9,16.625 8.375,16.625 D6.2@8.4,16.65 8.55,16.5 12.5,16.5 20.573,24.573 22.408,24.573 22.525,24.691 22.525,24.925 R19.2@22.8,25.2 ; R19.2@22.8,25.22 23.075,25.495 23.075,25.592 23.1,25.617 v2(23.1,26.7)
SC8: D10.1 J9.2 R10.2 R41.2 | length 14.2
  Top Layer w0.2: J9.2@5.9,5.225 7.55,5.225 D10.1@8.125,5.8 ; D10.1@8.797,5.997 13.725,10.925 R41.2@18.4,10.925
  Top Layer w0.305: D10.1@8.125,5.8 D10.1@8.2,5.8
SC9: D7.2 J10.3 R20.2 R51.2 | length 22.2
  Top Layer w0.2: R51.2@21.125,-0.7 23.232,-0.7 23.332,-0.6 v2(23.4,-0.6)
  Bottom Layer w0.2: J10.3@5.9,4.525 8.025,4.525 D7.2@8.1,4.6 ; D7.2@8.4,4.55 12.55,4.55 16.8,0.3 23.4,0.3 v2(23.4,-0.6)
SD0: D1.2 J1.3 R11.2 R32.2 | length 23.7
  Top Layer w0.2: J1.3@5.875,52.3 D1.2@8.375,52.3 ; D1.2@8.462,52.425 8.712,52.175 9.864,52.175 15.927,46.112 v2(18.283,46.112) ; v2(19.898,46.112) 19.927,46.112 20.719,45.32 20.719,43.075 20.719,42.931 20.95,42.7 21.017,42.7 21.609,42.108 22.692,42.108 23.2,41.6 23.2,41.34 R32.2@23.4,41.14
  Bottom Layer w0.2: v2(18.283,46.112) v2(19.898,46.112)
SD1: D4.1 J2.2 R21.2 R42.2 | length 20.5
  Top Layer w0.2: v2(8.6,49.9) 10.3,48.2 v2(13.1,48.2) ; v2(19.5,42.1) 19.548,42.052 19.748,42.052 20.4,41.4 20.525,41.4 R42.2@20.8,41.125
  Bottom Layer w0.2: J2.2@5.9,51.675 5.975,51.6 7.625,51.6 8.1,51.125 D4.1@8.1,51.1 ; D4.1@8.5,51 8.6,50.9 v2(8.6,49.9) ; v2(13.1,48.2) 15.075,48.2 19.175,44.1 19.2,44.1 19.475,43.825 R21.2@19.475,43.8 ; R21.2@19.332,43.796 19.5,43.628 v2(19.5,42.1)
SD2: D8.2 J3.3 R12.2 R33.2 | length 14.9
  Top Layer w0.2: J3.3@6.075,40.421 6.254,40.421 6.288,40.387 8.338,40.387 D8.2@8.45,40.275 ; D8.2@8.506,40.331 8.612,40.437 12.016,40.437 14.554,42.975 v2(15.843,42.975) ; v2(17.171,42.975) 17.78,42.975 R12.2@17.893,43.088 ; R12.2@17.875,43 18,42.875 18,41.334 R33.2@18.176,41.158
  Bottom Layer w0.2: v2(15.843,42.975) v2(17.171,42.975)
SD3: D2.1 J4.2 R22.2 R43.2 | length 11.9
  Top Layer w0.2: v2(15.5,42.1) 15.5,41.29 R43.2@15.575,41.215
  Bottom Layer w0.2: J4.2@5.9,39.575 7.65,39.575 8.2,39.025 D2.1@8.2,39 ; D2.1@8.4,39.05 8.598,39.248 11.223,39.248 13.075,41.1 R22.2@13.1,41.1 ; R22.2@13.1,40.9 14.3,40.9 v2(15.5,42.1)
SD4: D5.2 J5.3 R13.2 R34.2 | length 14
  Top Layer w0.2: J5.3@5.975,28.25 D5.2@8.55,28.25 ; D5.2@8.6,28.169 9.108,28.169 12.777,24.5 14.675,24.5 14.875,24.3 14.875,25.505 14.6,25.78 14.6,27.3 R34.2@14.4,27.5
  Top Layer w0.254: J5.3@5.9,28.175 J5.3@5.975,28.25 ; D5.2@8.55,28.25 D5.2@8.6,28.2
SD5: D9.1 J6.2 R23.2 R44.2 | length 13.6
  Top Layer w0.2: v2(17.023,26.695) R44.2@17.023,27.707
  Top Layer w0.254: R44.2@17.021,27.608 R44.2@17.023,27.607
  Bottom Layer w0.2: J6.2@5.9,27.475 7.65,27.475 D9.1@8.325,26.8 ; D9.1@8.775,26.8 9.975,25.6 12.975,25.6 R23.2@13.2,25.825 13.425,25.6 15.928,25.6 v2(17.023,26.695)
  Bottom Layer w0.254: D9.1@8.325,26.8 D9.1@8.775,26.8
SD6: D3.2 J7.3 R14.2 R35.2 | length 20.9
  Top Layer w0.2: J7.3@5.875,16 8.354,16 8.604,16.25 11.823,16.25 17,21.427 17,24.812 17.288,25.1 17.7,25.1 18.1,25.5 18.3,25.5 18.642,25.842 18.642,25.892 18.9,26.15 18.9,26.9 19.248,27.248 R35.2@19.248,27.506 ; R35.2@19.548,27.506 R35.2@19.65,27.608
SD7: D6.1 J8.2 R24.2 R45.2 | length 23.6
  Top Layer w0.2: v2(11.5,14.7) 19.929,23.129 v2(19.929,25.048) ; v2(21.9,26.7) R45.2@21.9,27.364
  Top Layer w0.254: R45.2@21.9,27.264 R45.2@22.244,27.608
  Bottom Layer w0.2: J8.2@6.3,15.4 7.525,15.4 8.175,14.75 D6.1@8.4,14.75 ; D6.1@8.4,14.7 v2(11.5,14.7) ; v2(19.929,25.048) 20.648,25.048 20.838,25.239 R24.2@20.777,25.3 ; 20.9,25.7 v2(21.9,26.7)
  Bottom Layer w0.254: R24.2@20.652,25.175 20.777,25.3 20.9,25.423 20.9,25.7
SD8: D10.2 J9.3 R15.2 R36.2 | length 18.3
  Top Layer w0.2: D10.2@8.4,3.95 11.05,3.95 16.8,9.7 v2(16.8,10.3) ; R36.2@19.7,10.925 v2(19.7,11.9)
  Top Layer w0.305: J9.3@5.9,3.975 5.913,3.963 8.237,3.963 D10.2@8.3,3.9
  Bottom Layer w0.2: v2(16.8,10.3) 16.8,10.4 18.3,11.9 v2@19.6,11.9
SD9: D7.1 J10.2 R25.2 R46.2 | length 12
  Top Layer w0.2: v2(15.8,-0.6) 16.775,-0.6 R46.2@16.875,-0.7
  Bottom Layer w0.2: J10.2@5.9,3.275 7.55,3.275 8.1,2.725 D7.1@8.1,2.6 ; D7.1@8.675,2.6 11.875,-0.6 13.225,-0.6 R25.2@13.4,-0.425 ; R25.2@13.6,-0.6 v2(15.8,-0.6)
SW_SC0: IC1.5 R37.1 | length 3.3
  Top Layer w0.2: IC1.5@20.325,37.425 20.4,37.5 20.4,38.2 21.298,39.098 21.783,39.098 21.9,39.216 21.9,39.4 22.085,39.585 R37.1@22.2,39.585
SW_SC1: IC1.7 R47.1 | length 2.6
  Top Layer w0.2: IC1.7@18.975,37.338 18.975,39.05 19.3,39.375 19.3,39.4 19.575,39.675 R47.1@19.6,39.675
SW_SC2: IC1.9 R38.1 | length 2.6
  Top Layer w0.2: R38.1@16.9,39.675 16.925,39.675 17.2,39.4 17.2,39.375 17.725,38.85 IC1.9@17.725,37.425
SW_SC3: IC1.11 R48.1 | length 3.4
  Top Layer w0.2: R48.1@14.3,39.65 14.325,39.65 14.6,39.375 14.6,39.25 15.25,38.6 15.711,38.6 16.25,38.061 16.25,37.6 IC1.11@16.425,37.425
SW_SC4: IC1.14 R39.1 | length 2.6
  Top Layer w0.2: R39.1@15.861,29.05 R39.1@15.886,29.05 ; R39.1@15.886,29.15 16.425,29.689 IC1.14@16.425,31.549
SW_SC5: IC1.16 R49.1 | length 2.5
  Top Layer w0.2: 17.675,29.548 18.165,29.058 R49.1@18.19,29.058 ; 17.675,29.648 IC1.16@17.675,31.462
SW_SC6: IC1.18 R40.1 | length 3
  Top Layer w0.2: IC1.18@19.025,31.549 19.1,31.474 19.1,30.535 R40.1@20.477,29.158 ; R40.1@20.477,29.058 R40.1@20.502,29.058
SW_SC7: IC1.20 R50.1 | length 4.6
  Top Layer w0.2: IC1.20@20.325,31.549 20.4,31.474 20.4,30.7 20.879,30.221 21.979,30.221 23,29.2 23.125,29.2 R50.1@23.4,28.925
SW_SC8: IC2.6 R41.1 | length 2.5
  Top Layer w0.2: IC2.6@18.4,7.238 R41.1@18.4,9.7
SW_SC9: IC2.10 R51.1 | length 2.6
  Top Layer w0.2: IC2.10@19.05,1.362 19.05,-0.375 R51.1@19.475,-0.8
  Top Layer w0.305: R51.1@19.575,-0.925 R51.1@19.575,-0.7
SW_SD0: IC1.4 R32.1 | length 4
  Top Layer w0.2: IC1.4@20.975,37.425 21.05,37.5 21.05,38.25 21.3,38.5 22.4,38.5 23.2,39.3 23.2,39.4 23.446,39.646 23.546,39.646 R32.1@23.546,39.684
SW_SD1: IC1.6 R42.1 | length 2.8
  Top Layer w0.2: IC1.6@19.675,37.425 19.75,37.5 19.75,38.35 20.6,39.2 20.6,39.4 20.875,39.675 R42.1@20.9,39.675
SW_SD2: IC1.8 R33.1 | length 2.4
  Top Layer w0.2: R33.1@18.3,39.675 18.4,39.575 18.4,37.413 IC1.8@18.325,37.338
SW_SD3: IC1.10 R43.1 | length 2.8
  Top Layer w0.2: R43.1@15.6,39.675 15.625,39.675 15.9,39.4 15.9,39.375 17.017,38.258 17.017,37.483 IC1.10@17.049,37.451
SW_SD4: IC1.13 R34.1 | length 3.1
  Top Layer w0.2: R34.1@14.4,29 15.775,30.375 IC1.13@15.775,31.549
SW_SD5: IC1.15 R44.1 | length 2.4
  Top Layer w0.2: R44.1@17.021,29.058 R44.1@17.075,29.112 ; R44.1@17.075,29.212 IC1.15@17.075,31.549
SW_SD6: IC1.17 R35.1 | length 2.8
  Top Layer w0.2: IC1.17@18.375,31.549 18.375,30.108 R35.1@19.325,29.158 ; R35.1@19.325,29.058 R35.1@19.35,29.058
SW_SD7: IC1.19 R45.1 | length 4
  Top Layer w0.2: IC1.19@19.675,31.549 19.675,30.511 20.267,29.92 21.082,29.92 21.8,29.202 21.8,29.025 R45.1@21.9,28.925
SW_SD8: IC2.5 R36.1 | length 2.4
  Top Layer w0.2: IC2.5@19.122,7.31 19.122,8.423 19.5,8.8 R36.1@19.5,9.3
  Top Layer w0.305: IC2.5@19.05,7.238 IC2.5@19.122,7.31 ; R36.1@19.6,9.3 R36.1@19.7,9.4
SW_SD9: IC2.9 R46.1 | length 2.3
  Top Layer w0.2: R46.1@18.4,-0.9 IC2.9@18.4,1.362
SYS_SWCLK: J12.1 UP1.37 | length 13.3
  Top Layer w0.2: UP1.37@27.8,21.1 27.8,22.46 35.74,30.4 J12.1@36.5,30.4
SYS_SWDIO: J12.2 UP1.34 | length 19
  Top Layer w0.2: UP1.34@28.5,19.4 UP1.34@28.5,19.4 v2@29.499,19.399 ; v2(29.5,19.398) 30.698,19.398 31.1,19.8 31.1,22.2 37.9,29 37.9,31.8 37.132,32.568 36.868,32.568 J12.2@36.8,32.5
USB_CC1: J11.A5 R54.1 | length 3.1
  Top Layer w0.269: R54.1@33.725,15.6 33.725,15.625 33.966,15.866 33.991,15.866 35.175,17.05 J11.A5@36.21,17.05
USB_CC2: J11.B5 R55.1 | length 3.5
  Top Layer w0.269: R55.1@33.725,22 33.966,21.759 33.966,21.434 35.335,20.065 36.194,20.065 J11.B5@36.21,20.05
USB_N: IC3.6 J11.A7 J11.B7 | length 5.3
  Top Layer w0.269: IC3.6@33.75,17.6 33.811,17.661 33.811,18.496 33.969,18.654 35.681,18.654 J11.A7@35.785,18.55 ; J11.B7@36.21,17.55 36.194,17.565 35.635,17.565 35.399,17.801 35.399,18.298 35.537,18.436 35.671,18.436 J11.A7@35.785,18.55 ; J11.A7@36.21,18.55 J11.A7@35.785,18.55
USB_P: IC3.1 J11.A6 J11.B6 | length 5.7
  Top Layer w0.269: IC3.1@33.75,20.1 33.75,19.208 33.908,19.05 J11.B6@36.21,19.05 36.225,19.035 36.784,19.035 37.021,18.798 37.021,18.302 36.784,18.065 36.225,18.065 J11.A6@36.21,18.05
pads on no net: IC2.11 IC4.3 IC4.7 J1.5 J1.6 J2.5 J2.6 J3.5 J3.6 J4.5 J4.6 J5.5 J5.6 J6.5 J6.6 J7.5 J7.6 J8.5 J8.6 J9.5 J9.6 J10.5 J10.6 J11. J11.A8 J11.B8 MH1.1 MH2.1 MH3.1 MH4.1 UP1.2 UP1.3 UP1.4 UP1.6 UP1.10 UP1.11 UP1.12 UP1.13 UP1.14 UP1.15 UP1.16 UP1.17 UP1.20 UP1.25 UP1.26 UP1.27 UP1.28 UP1.29 UP1.30 UP1.31 UP1.38 UP1.39 UP1.41 UP1.43 UP1.45

## Polygon pours and split planes (outlines as drawn)
GND on Top Layer "GND_L01_P002" (solid, pour order 2): 0,59.3 42.2,59.3 42.2,-2.4 0,-2.4
+3V3 on Top Layer "+3V3_L01_P000" (solid, pour order 0): 12.5,58.8 12.5,55.7 14.4,55.7 14.4,58.8
+VBUS on Top Layer "+VBUS_L01_P001" (solid, pour order 1): 31.6,54.3 34.2,54.3 34.2,51.6 31.6,51.6
+VBUS on Mid Layer 2 "+VBUS_L03_P007" (solid, pour order 7): 30.95,59.2 30.95,36.9 37.85,36.9 37.85,20.3 31.85,20.3 31.85,-2.3 42.25,-2.3 42.25,59.4 30.95,59.4 30.95,59.1
+3V3 on Mid Layer 2 "+3V3_L03_P008" (solid, pour order 8): 31.8,-2.4 0,-2.4 0,59.3 30.9,59.3 30.9,36.8 37.8,36.8 37.8,20.2 31.8,20.2
GND on Bottom Layer "GND_L04_P010" (solid, pour order 10): 0,59.3 42.2,59.3 42.2,-2.4 0,-2.4
GND on Mid Layer 1 "GND_L02_P005" (solid, pour order 5): 0,59.3 42.2,59.3 42.2,-2.4 0,-2.4

## Other copper
Top Layer:
  pour cut-out: 10.3,51.5 10,51.5 8.7,50.2 10.5,48.4 13,48.4 13.2,48.6
  pour cut-out: 24.9,11.8 25.4,11.8 25.4,10.8 24.9,10.8
  pour cut-out: 24.9,13.1 25,13.2 30.2,13.2 30.2,11.7 30.1,11.8 24.9,11.8 24.9,13.2 25.1,13.2
  pour cut-out: 11.9,16 12.3,15.6 19.9,23.2 19.9,23.9 19.8,24 19.6,23.8 17.2,23.8 17.2,21.4 11.9,16.1
  pour cut-out: 11.6,18 12.5,17.1 16.9,21.5 16.9,23.2 16.4,23.2 15.8,22.6 15.8,22.1 15.7,22.1
  pour cut-out: 22.5,30.7 22.5,30.4 23.1,29.8 24,29.8 24,31.3 23.1,31.3
  pour cut-out: 25.1,23.1 25.4,23.1 25.4,22.4 25.3,22.4 25.1,22.2
  pour cut-out: 23.8,23.1 24.2,23.1 24.2,21.6 24.1,21.5 23.4,21.5 23.4,22.3 23.7,22.3 23.7,22.6 23.8,22.7
  pour cut-out: 21.4,25.3 21.4,24.5 25.8,24.5 25.8,25.9 22,25.9
  pour cut-out: 14.9,25.8 16.3,25.8 16.3,23.6 14.9,23.6
  pour cut-out: 18.2,25.3 19.8,25.3 19.8,23.6 18.1,23.6 18.1,25.2
  pour cut-out: 17.9,9.9 18,9.8 18.8,9.8 18.8,9.1 18.7,9 18.5,9 18.5,8 18.6,7.9 18.7,8 19,8 19,8.5 19.4,8.9 19.3,9 19.3,9.9 20.3,9.9 20.3,10.5 19.3,10.5 19.2,10.6 19.3,10.7 19.3,11.4 18.7,11.4 18.7,10.4 18,10.4 17.9,10.5
  pour cut-out: 19.2,-0.2 21.6,-0.2 21.6,-0.5 23.1,-0.5 23.1,1.3 22.9,1.5 22,1.5 21.6,1.1 21.6,0.6 19.2,0.6
  pour cut-out: 19.1,14.7 19.1,14.4 19.6,14.4 19.6,14.8 20.1,14.8 20.6,15.3 20.4,15.5 20.4,15.6 18.4,15.6 18.3,15.5 18.3,14.7 18.3,15.5 18.3,14.7
  pour cut-out: 31.2,20.8 31.5,20.8 31.5,19.5 31.6,19.5 31.7,19.4 31.7,19 29.7,19 29.8,19.1 29.8,19.5 31,19.5 31.2,19.7
  pour cut-out: 33.9,19.5 34,19.4 33.8,19.2 33.8,16.9 32.2,16.9 32.2,18.2 31.9,18.2 31.8,18.3 31.8,19.5 32.1,19.5
  pour cut-out: 14,43.5 14.4,43.1 12.4,41.1 12.4,41.9 12.3,42 13.8,43.5
  pour cut-out: 22.4,26.8 22.2,26.8 22.2,27 22.4,27
  pour cut-out: 22.5,28 23,28 23,26.9 22.9,26.8 22.4,26.8 22.4,27.9
  pour cut-out: 21.2,27.9 21.7,27.9 21.7,26.9 21.6,26.8 20.9,26.8 20.9,27.6
  pour cut-out: 15.2,38.4 15.2,38.1 15.8,38.1 15.8,38.4
  pour cut-out: 21.5,42.6 21.6,42.5 21.6,42.2 22.8,42.2 22.7,42.3 22.7,42.7 21.8,42.7 21.6,42.5
  pour cut-out: 19.1,45.1 19.6,45.1 19.6,44.3 19.9,44 19.8,43.9 19.8,43.2 19.2,43.2 18.9,43.5 18.9,44.9
  pour cut-out: 17.6,45.1 18.2,45.1 18.2,43.5 17.6,43.5 17.3,43.2 17.2,43.3 16.8,43.3 16.8,44.3
  pour cut-out: 14.5,40.4 14.6,40.5 16.6,40.5 16.6,43.8 16.8,44 16.8,44.5 14.6,44.5 14.5,44.4
  pour cut-out: 21.4,38.3 21.4,38.1 22.6,38.1 22.6,38.4 21.5,38.4
  pour cut-out: 13.8,40.6 13.8,40.1 23.9,40.1 23.9,40.6
  pour cut-out: 23.9,27.9 23.9,28.5 13.8,28.5 13.8,27.9 13.8,28.5 13.8,27.9
Bottom Layer:
  pour cut-out: 13.2,48 15.1,48 19.4,43.7 19.4,42.5 18.7,42.5 18.6,42.4 13.1,47.9

## Silkscreen, mask and mechanical layers (free items; w line width, h text height)
Top Overlay:
  text "+3V3" at 32.087,44.7 h1.2 r90
  text "GND" at 39.187,36.8 h1.2 r90
  text "+3V3" at 39.287,33.9 h1.2 r90
  text "DIO" at 39.287,31.7 h1.2 r90
  text "CLK" at 39.287,29.1 h1.2 r90
  text "MCU" at 29.187,27 h1.2 r90
  text "VBUS" at 35.987,8.201 h1.2 r90
Board Shape:
  the board outline again, w0.254